# Altium PCB QFN-28_L6.0-W6.0-P0.65-BL-EP3.7.pcbdoc
Units mm, origin at the board's own origin, x right, y up, seen from the top; angles counter-clockwise.
Board outline 19.51 x 19.63 mm, 2 copper layers (Top Layer, Bottom Layer), stack 0 mm thick; 1 components, 0 nets, 29 pads, 0 vias.
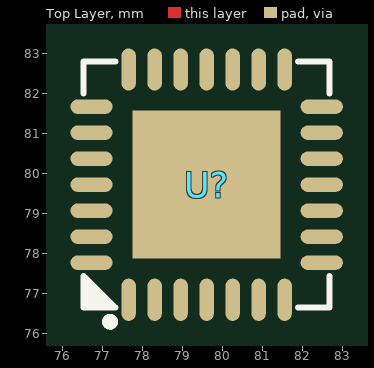
[diagram p0: Top Layer view]
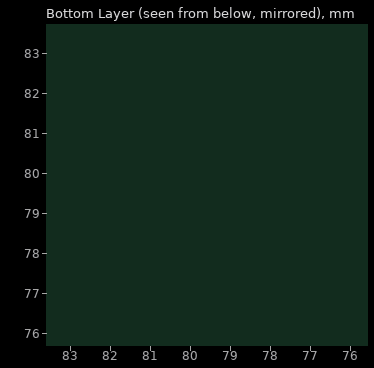
[diagram p1: Bottom Layer view, seen from below]

## Layer stack, top to bottom
Top Layer: signal copper (thickness not stored)
Bottom Layer: signal copper (thickness not stored)

## Board outline
89.36,69.85 69.85,69.85 69.85,89.484 89.36,89.484

## Components (designator, comment, footprint, x,y, rotation, side; value= is the part's Value field where it differs from the comment)
U? "" QFN-28_L6.0-W6.0-P0.65-BL-EP3.7 79.605,79.729 r0 top

## Footprints (in the part's own frame and the unit in brackets; to place one, negate y for a bottom-side part, rotate by r counter-clockwise, add the part's x,y. Pads: shape width x height; smd on the part's side, far side on the other; paste and mask are expansions set on the pad)
QFN-28_L6.0-W6.0-P0.65-BL-EP3.7 [mm]
  oval 0.364x1.055 smd paste-100 mask+0.051: 1(-1.95,-2.878) 2(-1.3,-2.878) 3(-0.65,-2.878) 4(0,-2.878) 5(0.65,-2.878) 6(1.3,-2.878) 7(1.95,-2.878) 15(1.95,2.878) 16(1.3,2.878) 17(0.65,2.878) 18(0,2.878) 19(-0.65,2.878) 20(-1.3,2.878) 21(-1.95,2.878)
  oval 1.055x0.364 smd paste-100 mask+0.051: 8(2.878,-1.95) 9(2.878,-1.3) 10(2.878,-0.65) 11(2.878,0) 12(2.878,0.65) 13(2.878,1.3) 14(2.878,1.95) 22(-2.878,1.95) 23(-2.878,1.3) 24(-2.878,0.65) 25(-2.878,0) 26(-2.878,-0.65) 27(-2.878,-1.3) 28(-2.878,-1.95)
  rect 3.7x3.7 smd paste-100 mask+0.051: 29(0,0)
  silkscreen extent -3.08,-3.53 3.08,3.08

## Nets (pads, with @x,y where several pads share a name; then routed paths per layer and width w, separated by ;. In a path a pad name is that pad's centre, name@x,y a point inside that pad or via, vN(x,y) a via of type N, cw(c..) or ccw(c..) an arc to the next point about the centre after c; other vN are vias at no path point)
pads on no net: U?.1 U?.2 U?.3 U?.4 U?.5 U?.6 U?.7 U?.8 U?.9 U?.10 U?.11 U?.12 U?.13 U?.14 U?.15 U?.16 U?.17 U?.18 U?.19 U?.20 U?.21 U?.22 U?.23 U?.24 U?.25 U?.26 U?.27 U?.28 U?.29